# Altium PCB current sink.PcbDoc (part 1 of 2)
Units mm, origin at the board's own origin, x right, y up, seen from the top; angles counter-clockwise.
Board outline 128.91 x 103.89 mm, 2 copper layers (Top Layer, Bottom Layer); 147 components, 85 nets, 489 pads, 208 vias.
Unrouted connection lines stored in the file: 1.
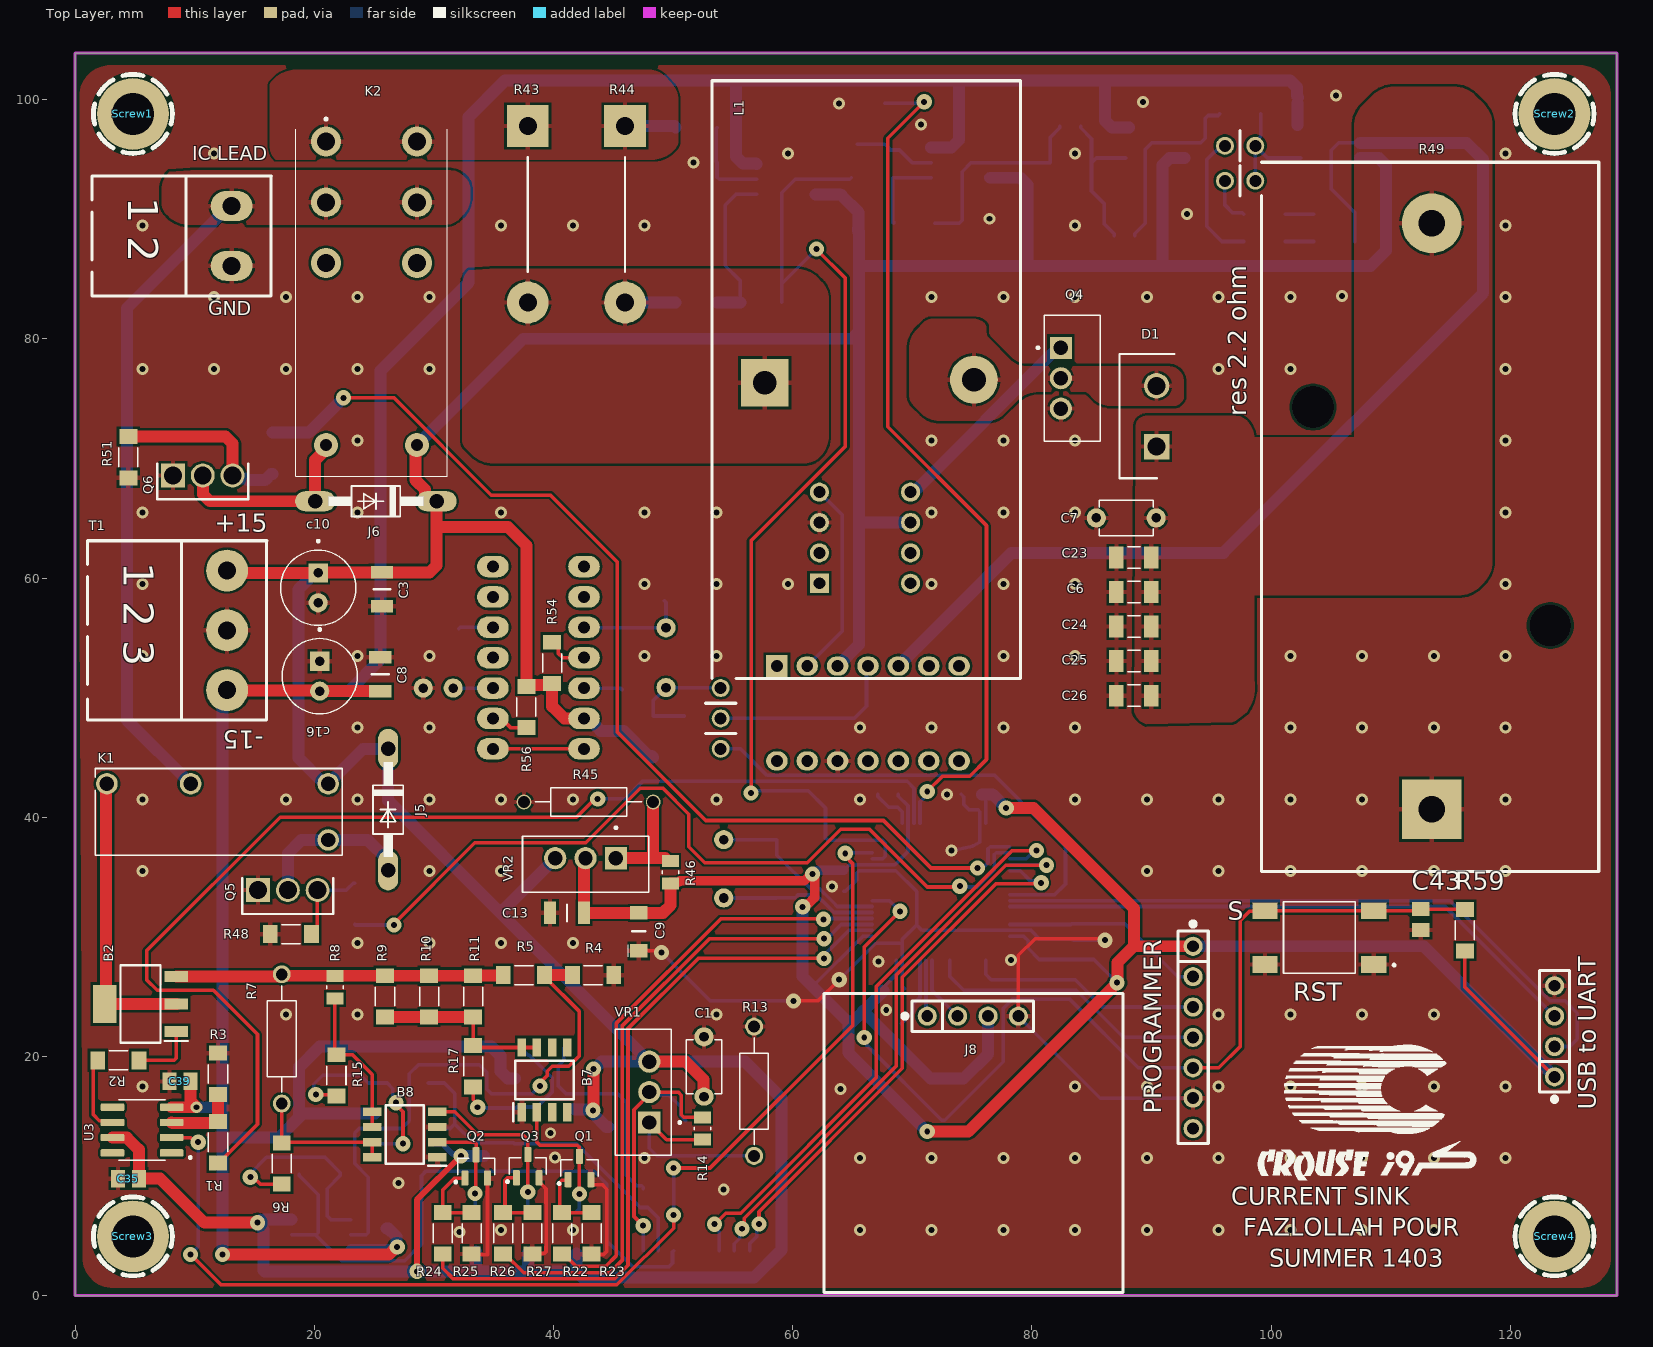
[diagram p0: Top Layer view]
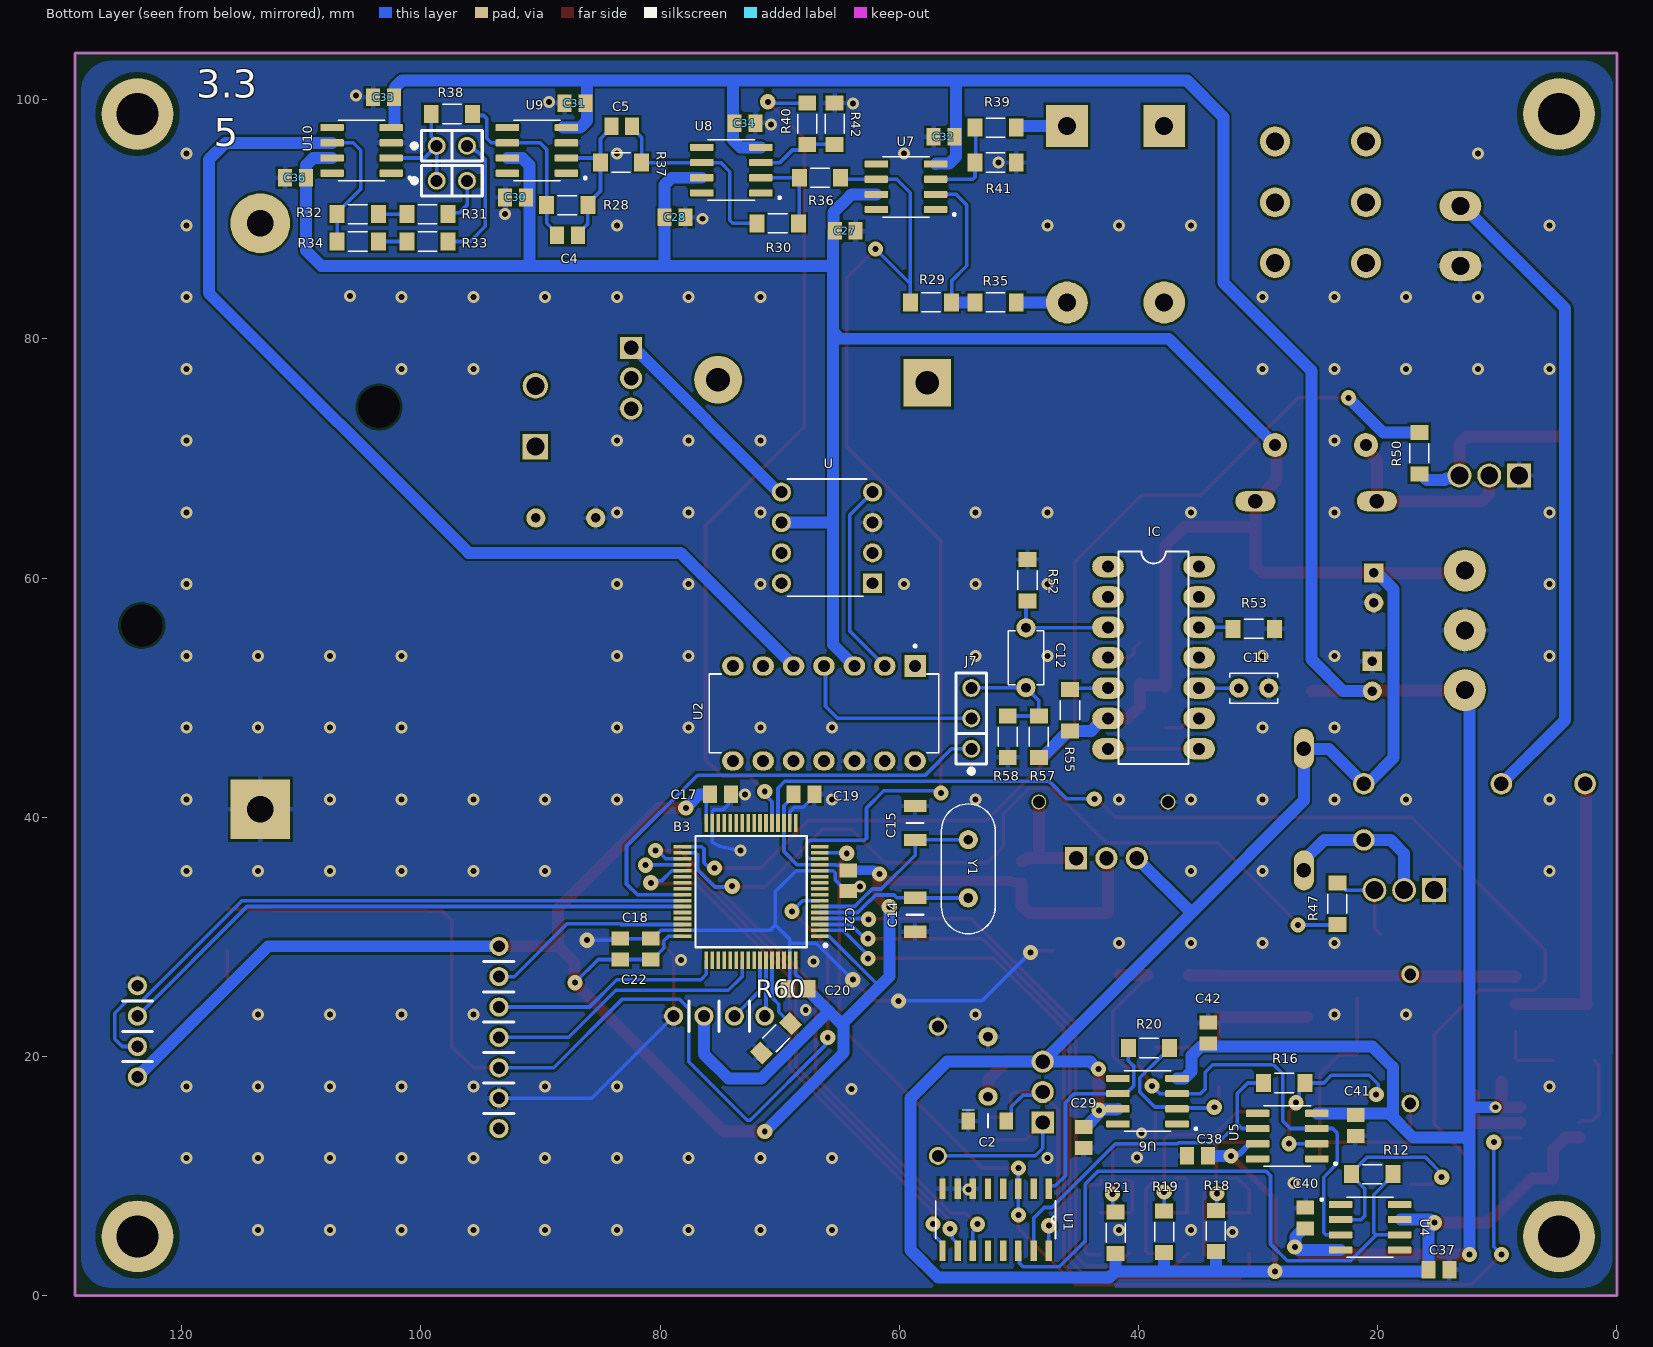
[diagram p1: Bottom Layer view, seen from below]
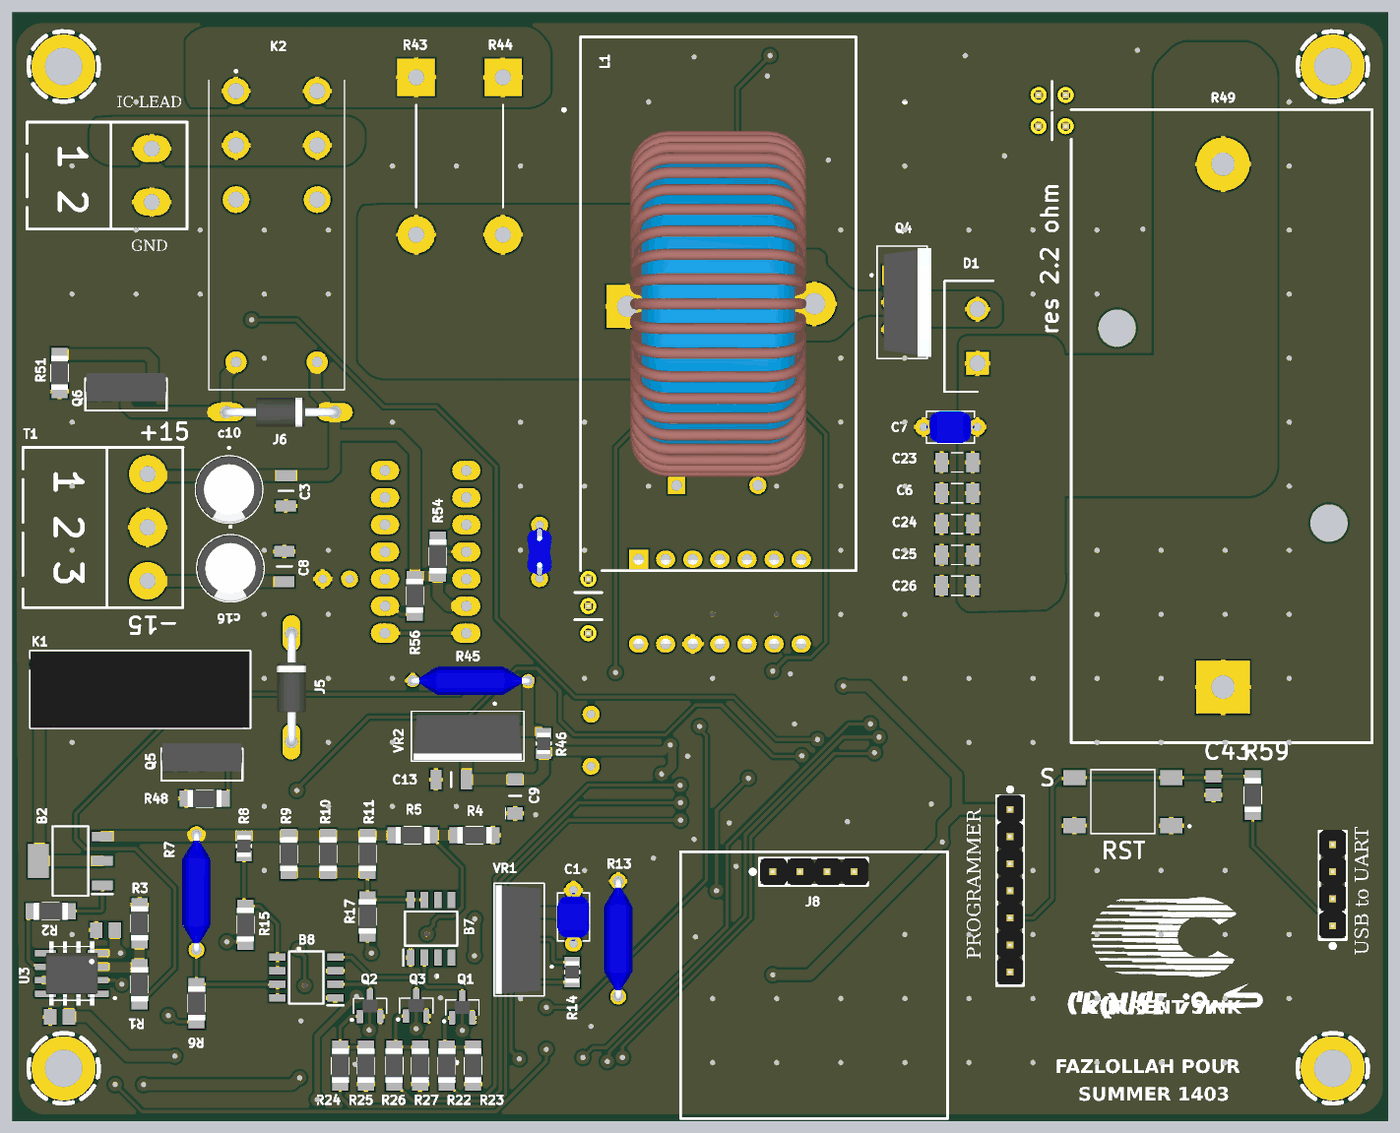
[diagram p3: 3D render of the assembled board from above, using the file's embedded part models]
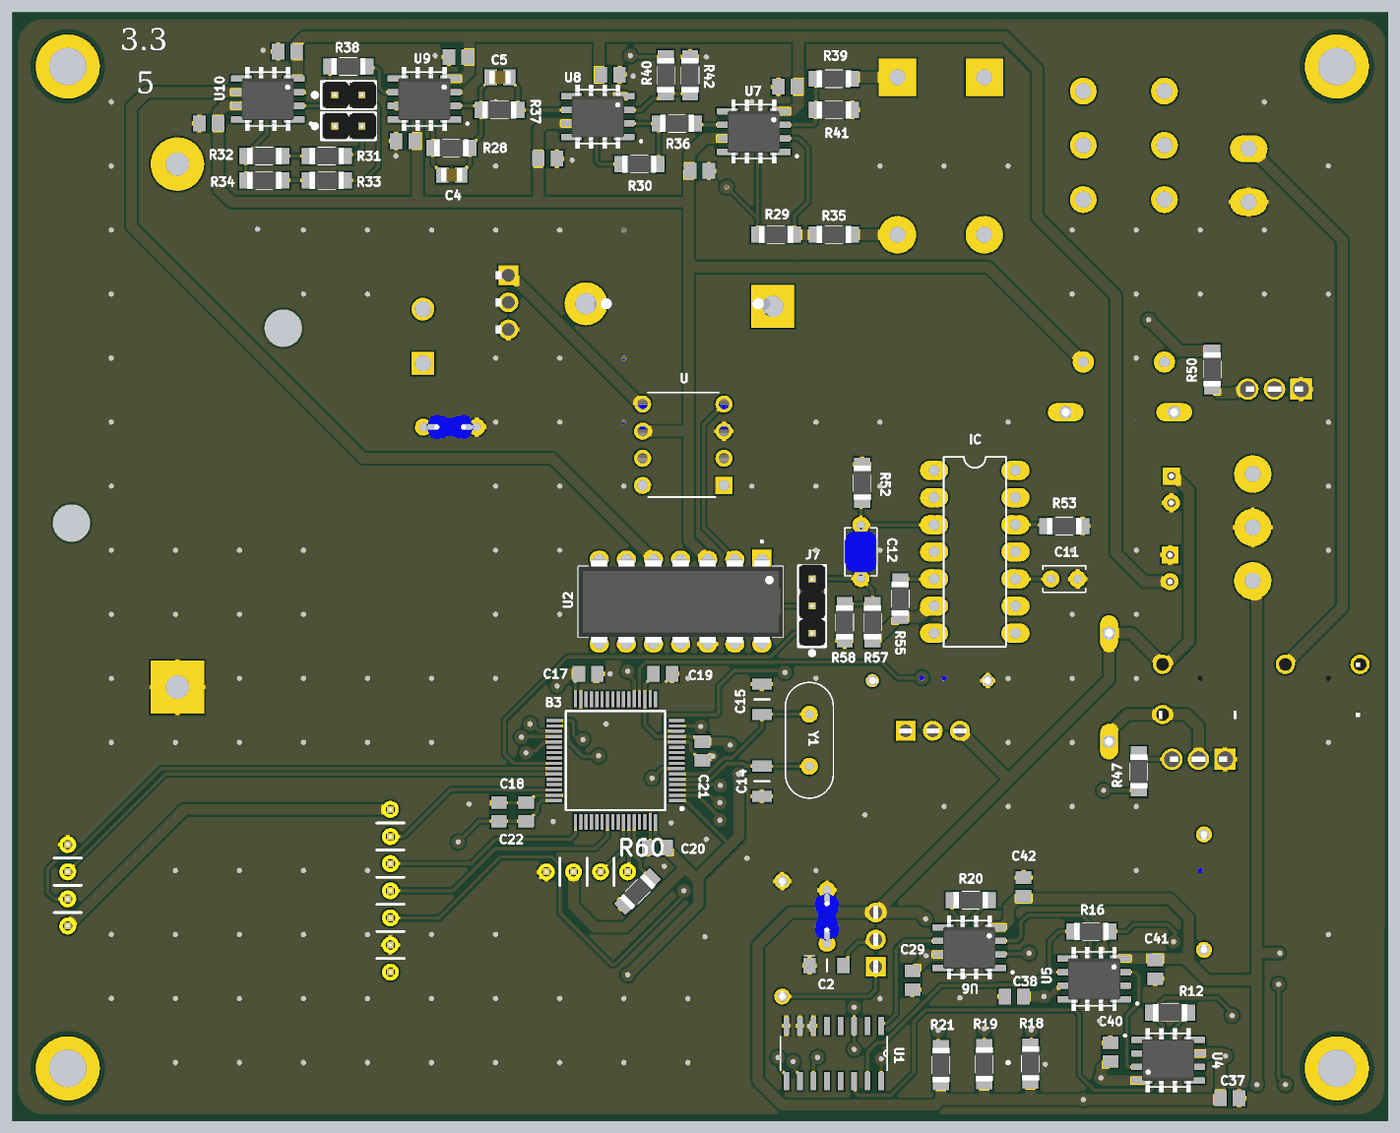
[diagram p4: 3D render of the assembled board from below, using the file's embedded part models]

## Layer stack, top to bottom
Top Solder: solder mask 0.0102, Solder Resist, Dk 3.5
Top Layer: signal copper 0.0356
Dielectric 1: dielectric 0.32, FR-4, Dk 4.8
Bottom Layer: signal copper 0.0356
Bottom Solder: solder mask 0.0102, Solder Resist, Dk 3.5

## Board outline
0,0 0,103.886 128.905,103.886 128.905,0

## Design rules (kind name [scope] priority, off if disabled: settings)
Clearance [All] p1: gap=0.2 ignorepadtopadclearanceinfootprint=TRUE
Height [All] p1: minheight=0 maxheight=50 prefheight=12.7
HoleSize [All] p1: absolutevalues=TRUE maxlimit=5 minlimit=0.025 maxpercent=80.000 minpercent=20.000
PolygonConnect PolygonConnect_1 [All vs (InNet('NetC6_1') AND InNet('NetD1_2') AND InNet('fb+') AND InNet('fb-') AND InNet('IC pin'))] p1: thpad.connectstyle=Relief thpad.reliefconductorwidth=0.7 thpad.reliefentries=4 thpad.polygonreliefangle="90 Angle" thpad.airgapwidth=0.2 smdpad.connectstyle=Relief smdpad.reliefconductorwidth=0.7 smdpad.reliefentries=4 smdpad.polygonreliefangle="90 Angle" smdpad.airgapwidth=0.2 via.connectstyle=Direct via.reliefconductorwidth=0.254 via.reliefentries=4 via.polygonreliefangle="90 Angle" via.airgapwidth=0.254
PolygonConnect [All] p2: thpad.connectstyle=Relief thpad.reliefconductorwidth=0.4 thpad.reliefentries=4 thpad.polygonreliefangle="90 Angle" thpad.airgapwidth=0.2 smdpad.connectstyle=Relief smdpad.reliefconductorwidth=0.4 smdpad.reliefentries=4 smdpad.polygonreliefangle="90 Angle" smdpad.airgapwidth=0.2 via.connectstyle=Direct via.reliefconductorwidth=0.254 via.reliefentries=4 via.polygonreliefangle="90 Angle" via.airgapwidth=0.254
RoutingVias [All] p1: holewidth=0.711 width=1.27 viastyle="Through Hole" minholewidth=0.5 minwidth=1 maxholewidth=5 maxwidth=5
SolderMaskExpansion [All] p1: expansion=0.102 istentingtop=FALSE
SupplyNets "Schematic Supply Nets_3" [InNet('+15')] p1: voltage=0.000
SupplyNets "Schematic Supply Nets_2" [InNet('GND')] p2: voltage=0.000
SupplyNets "Schematic Supply Nets_1" [InNet('-15')] p3: voltage=0.000
SupplyNets "Schematic Supply Nets" [InNet('+3.3')] p4: voltage=0.000
Width [All] p1: maxlimit=20 minlimit=0.3 preferedwidth=0.3 minimp=50.000000 maximp=50.000000 favimp=50.000000
28 further rules are at their usual default settings.

## Components (designator, comment, footprint, x,y, rotation, side; value= is the part's Value field where it differs from the comment)
3.3 "if tri 5" Header-1X2 97.409,96.139 r180 bottom (schematic designator J3)
5 "if tri 3.3" Header-1X2 97.409,93.218 r180 bottom (schematic designator J2)
B2 "BSP100" SOT230P700X180-4N 5.461,24.384 r180 top
B3 "STM32F103RCT6" QFP50P1200X1200X160-64N 72.39,33.782 r0 bottom
B7 "IRF7303PBF" SOIC127P600X175-8N 39.243,18.034 r90 top
B8 "IRF7303PBF" SOIC127P600X175-8N 27.559,13.462 r180 top
C1 "100nf ceramic" CAPRB500W50L450T300H550#1 52.578,19.137 r270 top
C2 "tantalum 1uf" CAPC2012X140N 52.578,14.605 r180 bottom
C3 "cap 100nf" CAPC3216X170N 25.654,59.055 r90 top
C4 "180nF 0805" CAPC2012X145N 87.739,88.646 r0 bottom
C5 "390nF 0805" CAPC2012X145N 83.203,97.79 r0 bottom
C6 "47uf 1206" CAPC3216X180N 88.519,58.833 r0 top
C7 "100nf ceramic" CAPRB500W50L450T300H550#2 87.884,65.024 r0 top
C8 "cap 100nf" CAPC3216X170N 25.504,51.966 r90 top
C9 "tantalum 1uf" CAPC2012X140N 47.117,30.48 r90 top
c10 "Cap 100uF" "Cap 100uF" 20.32,59.182 r270 top
C11 "1nF cermicd102" CAPRB250W50L400T250H550 30.353,50.8 r0 bottom
C12 "100nf ceramic" CAPRB500W50L450T300H550#2 49.403,53.34 r270 bottom
C13 "cap 100nf 1206" CAPC3216X170N 41.125,32.004 r0 top
C14 "cap 20pf 1206" CAPC3216X170N 58.674,31.854 r270 bottom
C15 "cap 20pf 1206" CAPC3216X170N 58.674,39.52 r90 bottom
c16 "Cap 100uF" "Cap 100uF" 20.447,51.796 r270 top
C17 "100nf 0805" CAPC2012X145N 74.948,41.91 r180 bottom
C18 "100nf 0805" CAPC2012X145N 80.772,28.974 r90 bottom
C19 "100nf 0805" CAPC2012X145N 67.963,41.91 r180 bottom
C20 "100nf 0805" CAPC2012X145N 68.471,25.654 r0 bottom
C21 "100nf 0805" CAPC2012X145N 64.262,34.689 r270 bottom
C22 "4.7uf 0805" CAPC2012X145N 83.312,28.974 r90 bottom
C23 "47uf 1206" CAPC3216X180N 88.519,61.722 r0 top
C24 "47uf 1206" CAPC3216X180N 88.519,55.944 r0 top
C25 "47uf 1206" CAPC3216X180N 88.519,53.054 r0 top
C26 "47uf 1206" CAPC3216X180N 88.519,50.165 r0 top
C27 "100nf 0805" CAPC2012X145N 64.516,89.027 r180 bottom
C28 "100nf 0805" CAPC2012X145N 78.74,90.17 r180 bottom
C29 "100nf 0805" CAPC2012X145N 44.577,13.208 r270 bottom
C30 "100nf 0805" CAPC2012X145N 92.075,91.821 r0 bottom
C31 "100nf 0805" CAPC2012X145N 87.122,99.695 r0 bottom
C32 "100nf 0805" CAPC2012X145N 56.261,96.901 r0 bottom
C33 "100nf 0805" CAPC2012X145N 103.124,100.203 r0 bottom
C34 "100nf 0805" CAPC2012X145N 72.898,98.044 r180 bottom
C35 "100nf 0805" CAPC2012X145N 4.445,9.779 r180 top
C36 "100nf 0805" CAPC2012X145N 110.49,93.472 r0 bottom
C37 "100nf 0805" CAPC2012X145N 14.859,2.159 r180 bottom
C38 "100nf 0805" CAPC2012X145N 35.052,11.684 r0 bottom
C39 "100nf 0805" CAPC2012X145N 8.763,17.907 r180 top
C40 "100nf 0805" CAPC2012X145N 26.035,6.477 r90 bottom
C41 "100nf 0805" CAPC2012X145N 21.844,14.224 r270 bottom
C42 "100nf 0805" CAPC2012X145N 34.163,21.953 r90 bottom
C43 "100nf 0805" CAPC2012X145N 112.522,31.442 r270 top
D1 "STPS1545FP" TO508P460X1020X2030-2P 90.424,70.998 r90 top
IC "ICL8038" ICL8038 38.735,53.34 r270 bottom
"IC LEAD" "Phoenix terminal" "phoenix terminal 2" 1.397,93.599 r270 top (schematic designator T2)
J5 "1N5817" DO41-10 26.162,40.64 r270 top
J6 "1N5817" DO41-10 25.146,66.421 r180 top
J7 "Header-1X3" Header-1X3 53.975,48.26 r90 bottom
J8 "oled" Header-1X4 75.057,23.368 r0 top
K1 "G5NB-1A-E_DC12" RELAY_G5NB-1A_DC5_OMR 2.852,38.099 r270 top
K2 "TRA2_D-24VDC-S-Z" TRA2D24VDCSZ 20.975,96.5 r270 top
L1 "inductor 100u" inductor 57.15,76.581 r0 top
PROGRAMMER "programmer" Header-1X7 93.472,21.59 r270 top (schematic designator J1)
Q1 "BC817" SOT95P230X110-3N 42.164,10.668 r90 top
Q2 "BC817" SOT95P230X110-3N 33.528,10.795 r90 top
Q3 "BC817" SOT95P230X110-3N 37.846,10.831 r90 top
Q4 "IRLZ44N" TO254P1054X469X1930-3 83.363,76.708 r270 top
Q5 "BD137" TO229P300X760X1237-3P 17.78,33.909 r90 top
Q6 "BD137" TO229P300X760X1237-3P 10.668,68.58 r90 top
R1 "18k 1206" RES_ERJU08J274V 11.938,12.827 r90 top
R2 "10 ohm 1206" RES_ERJU08J274V 3.609,19.672 r0 top
R3 "2k 1206" RES_ERJU08J274V 11.938,18.542 r270 top
R4 "100k 1206" RES_ERJU08J274V 43.307,26.797 r0 top
R5 "100k 1206" RES_ERJU08J274V 37.518,26.797 r0 top
R6 "100k 1206" RES_ERJU08J274V 17.272,11.049 r270 top
R7 "33ohm axial" RESAD1081W64L635D269#1 17.272,21.463 r90 top
R8 "1.2 ohm 0805" RESC2012X60N 21.717,25.781 r90 top
R9 "1ohm 1206" RES_ERJU08J274V 25.908,25.019 r90 top
R10 "1ohm 1206" RES_ERJU08J274V 29.591,25.019 r90 top
R11 "1ohm 1206" RES_ERJU08J274V 33.274,25.019 r90 top
R12 "100k 1206" RES_ERJU08J274V 20.447,10.16 r180 bottom
R13 "604ohm axial" RESAD1081W64L635D269#1 56.769,17.089 r90 top
R14 "240ohm 0805" RESC2012X60N 52.451,13.97 r90 top
R15 "100k 1206" RES_ERJU08J274V 21.844,18.415 r270 top
R16 "100k 1206" RES_ERJU08J274V 27.813,17.78 r0 bottom
R17 "100k 1206" RES_ERJU08J274V 33.274,19.177 r270 top
R18 "10k 1206" RES_ERJU08J274V 33.528,5.408 r270 bottom
R19 "10k 1206" RES_ERJU08J274V 37.846,5.334 r270 bottom
R20 "100k 1206" RES_ERJU08J274V 39.116,20.701 r0 bottom
R21 "10k 1206" RES_ERJU08J274V 41.91,5.26 r270 bottom
R22 "10k 1206" RES_ERJU08J274V 40.716,5.207 r270 top
R23 "10k 1206" RES_ERJU08J274V 43.18,5.207 r90 top
R24 "10k 1206" RES_ERJU08J274V 30.734,5.207 r90 top
R25 "10k 1206" RES_ERJU08J274V 33.147,5.207 r90 top
R26 "10k 1206" RES_ERJU08J274V 35.789,5.207 r270 top
R27 "10k 1206" RES_ERJU08J274V 38.227,5.207 r90 top
R28 "1.21M 1206" RES_ERJU08J274V 87.757,91.186 r180 bottom
R29 "10k 1206" RES_ERJU08J274V 57.351,83.058 r0 bottom
R30 "1k 1206" RES_ERJU08J274V 70.157,89.662 r180 bottom
R31 "2k 1206" RES_ERJU08J274V 99.441,90.424 r180 bottom
R32 "3k 1206" RES_ERJU08J274V 105.283,90.424 r180 bottom
R33 "100ohm 1206" RES_ERJU08J274V 99.441,88.138 r180 bottom
R34 "7.5k 1206" RES_ERJU08J274V 105.283,88.138 r180 bottom
R35 "1k 1206" RES_ERJU08J274V 51.943,83.058 r180 bottom
R36 "1k 1206" RES_ERJU08J274V 66.622,93.472 r180 bottom
R37 "9.09k 1206" RES_ERJU08J274V 83.259,94.742 r180 bottom
R38 "2k 1206" RES_ERJU08J274V 97.409,98.806 r180 bottom
R39 "1k 1206" RES_ERJU08J274V 51.943,97.663 r180 bottom
R40 "1k 1206" RES_ERJU08J274V 67.691,97.991 r90 bottom
R41 "10k 1206" RES_ERJU08J274V 51.943,94.742 r0 bottom
R42 "1k 1206" RES_ERJU08J274V 65.405,97.991 r90 bottom
R43 "shunt res" shunt 37.846,97.79 r270 top
R44 "shunt res" shunt 45.974,97.79 r270 top
R45 "400ohm axial" RESAD1081W64L635D269#2 42.926,41.275 r180 top
R46 "240ohm 0805" RESC2012X60N 49.784,35.387 r270 top
R47 "12.7k 1206" RES_ERJU08J274V 23.368,32.766 r270 bottom
R48 "100k 1206" RES_ERJU08J274V 18.034,30.226 r180 top
R49 "resistor 2.2" resssss 113.425,40.665 r90 top
R50 "5k 1206" RES_ERJU08J274V 16.51,70.432 r90 bottom
R51 "100k 1206" RES_ERJU08J274V 4.445,70.104 r270 top
R52 "100k 1206" RES_ERJU08J274V 49.276,59.817 r270 bottom
R53 "82k 1206" RES_ERJU08J274V 30.353,55.753 r180 bottom
R54 "3k 1206" RES_ERJU08J274V 39.878,52.906 r90 top
R55 "3k 1206" RES_ERJU08J274V 45.72,48.948 r90 bottom
R56 "10k 1206" RES_ERJU08J274V 37.719,49.223 r270 top
R57 "20k 1206" RES_ERJU08J274V 48.323,46.736 r270 bottom
R58 "10k 1206" RES_ERJU08J274V 50.927,46.736 r90 bottom
R59 "10k 1206" RES_ERJU08J274V 116.205,30.548 r270 top
R60 "10k 1206" RES_ERJU08J274V 70.308,21.513 r315 bottom
S "1571527-2" SW_1571527-2 104.035,29.936 r180 top
Screw1 "Screw" Screw 4.826,98.806 r0 top
Screw2 "Screw" Screw 123.698,98.806 r0 top
Screw3 "Screw" Screw 4.826,4.953 r0 top
Screw4 "Screw" Screw 123.698,4.953 r0 top
T1 "Phoenix terminal" "phoenix terminal 3" 1.016,63.119 r270 top
U "TC4428CPA" DIP254P762X432-8 69.85,67.183 r0 bottom
U1 "74HC4051D" SOIC127P600X175-16N 51.943,6.35 r270 bottom
U2 "LM339N" DIP794W45P254L1918H533Q14 66.294,48.674 r270 bottom
U3 "OP07CD" SOIC127P599X175-8N 5.588,13.843 r180 top
U4 "OP07CD" SOIC127P599X175-8N 20.631,5.715 r180 bottom
U5 "OP07CD" SOIC127P599X175-8N 27.559,13.335 r0 bottom
U6 "OP07CD" SOIC127P599X175-8N 39.243,16.256 r0 bottom
U7 "OP07CD" SOIC127P599X175-8N 59.436,92.71 r0 bottom
U8 "OP07CD" SOIC127P599X175-8N 74.041,94.107 r0 bottom
U9 "OP07CD" SOIC127P599X175-8N 90.297,95.758 r0 bottom
U10 "OP07CD" SOIC127P599X175-8N 104.959,95.758 r0 bottom
"USB to UART" "USB to UART" Header-1X4 123.698,22.098 r90 top (schematic designator J4)
VR1 "LM317T" TO254P1054X470X1955-3 48.006,17.018 r90 top
VR2 "LM317T" TO254P1054X470X1955-3 42.672,36.576 r180 top
Y1 "8MHz" XTAL_HC49P488W43L1085T450H368 54.229,35.687 r270 bottom

## Footprints (in the part's own frame and the unit in brackets; to place one, negate y for a bottom-side part, rotate by r counter-clockwise, add the part's x,y. Pads: shape width x height; smd on the part's side, far side on the other; paste and mask are expansions set on the pad)
"Cap 100uF" [mm]
  rect 1.6x1.6 hole 0.8: 1(-1.25,0)
  round 1.6 hole 0.8: 2(1.25,0)
  silkscreen extent -4,-3.15 3.15,3.15, body extent -3.15,-3.15 3.15,3.15, height 11.2
CAPC2012X140N [mm]
  rect 1.15x1.45 smd: 1(-1.651,0) 2(1.524,0)
  silkscreen extent -2.16,-0.55 0,0.89
CAPC2012X145N [mm]
  rect 1.17x1.47 smd: 1(-0.871,0) 2(0.871,0)
  body extent -1,-0.63 1,0.63, height 1.45
CAPC3216X170N [mm]
  rect 1.03x1.87 smd: 1(-1.42,0) 2(1.42,0)
  silkscreen extent 0,-0.7 0,0.7
CAPC3216X180N [mm]
  rect 1.21x1.82 smd: 1(-1.45,0) 2(1.45,0)
  silkscreen extent -0.52,-0.9 0.52,0.9
CAPRB250W50L400T250H550 [mm]
  round 1.6 hole 0.8: 1(-1.25,0) 2(1.25,0)
  silkscreen extent -2,-1.25 2,1.25
CAPRB500W50L450T300H550#1 [mm]
  round 1.6 hole 0.8: 1(-2.5,0)
  oval 1.5x1.6 hole 0.8: 2(2.5,0)
  silkscreen extent -2.25,-1.5 2.25,1.5, body extent -2.24,-1.5 2.24,1.5, height 2.75
CAPRB500W50L450T300H550#2 [mm]
  round 1.6 hole 0.8: 1(-2.5,0) 2(2.5,0)
  silkscreen extent -2.25,-1.5 2.25,1.5, body extent -2.24,-1.5 2.24,1.5, height 2.75
DIP254P762X432-8 [mm]
  rect 1.6x1.6 hole 1: 1(-7.62,7.62)
  round 1.6 hole 1: 2(-7.62,5.08) 3(-7.62,2.54) 4(-7.62,0) 5(0,0) 6(0,2.54) 7(0,5.08) 8(0,7.62)
  silkscreen extent -7.11,-1.09 -0.51,8.71
DIP794W45P254L1918H533Q14 [mm]
  rect 1.8x1.8 / inner round 1.8 / far side rect 1.8x1.8 hole 1: 1(-3.97,7.62)
  oval 1.6x1.8 hole 1: 2(-3.97,5.08) 3(-3.97,2.54) 4(-3.97,0) 5(-3.97,-2.54) 6(-3.97,-5.08) 7(-3.97,-7.62) 8(3.97,-7.62) 9(3.97,-5.08) 10(3.97,-2.54) 11(3.97,0) 12(3.97,2.54) 13(3.97,5.08) 14(3.97,7.62)
  silkscreen extent -5.73,-9.59 3.3,9.59, body extent -3.95,-9.59 3.95,9.59, height 5.33
DO41-10 [mil]
  oval 132x66 hole 47.24: A(200,0) C(-200,0)
  silkscreen extent -155,-50 155,50, body extent -216,-53 216,53, height 106
Header-1X2 [mm] "Pin Header 1X2, Pitch=2.54mm"
  round 1.5 hole 1: 1(-1.27,0) 2(1.27,0)
  silkscreen extent -3.33,-1.27 2.54,1.27, body extent -2.44,-1.25 2.64,1.25, height 8.24
Header-1X3 [mm] "Pin Header 1X3, Pitch=2.54mm"
  round 1.5 hole 1: 1(-2.54,0) 2(0,0) 3(2.54,0)
  silkscreen extent -4.6,-1.27 3.81,1.27, body extent -3.71,-1.25 3.91,1.25, height 8.24
Header-1X4 [mm] "Pin Header 1X4, Pitch=2.54mm"
  round 1.6 hole 1: 1(-3.81,0) 2(-1.27,0) 3(1.27,0) 4(3.81,0)
  silkscreen extent -5.87,-1.27 5.08,1.27, body extent -4.98,-1.25 5.18,1.25, height 8.24
Header-1X7 [mm] "Pin Header 1X7, Pitch=2.54mm"
  round 1.6 hole 1: 1(-7.62,0) 2(-5.08,0) 3(-2.54,0) 4(0,0) 5(2.54,0) 6(5.08,0) 7(7.62,0)
  silkscreen extent -9.68,-1.27 8.89,1.27, body extent -8.99,-1.25 8.79,1.25, height 8.2
ICL8038 [mm]
  oval 1.8x2.642 hole 1: 1(-7.62,-3.81) 2(-5.08,-3.81) 3(-2.54,-3.81) 4(0,-3.81) 5(2.54,-3.81) 6(5.08,-3.81) 7(7.62,-3.81) 8(7.62,3.81) 9(5.08,3.81) 10(2.54,3.81) 11(0,3.81) 12(-2.54,3.81) 13(-5.08,3.81) 14(-7.62,3.81)
  silkscreen extent -8.89,-2.92 8.89,2.92
inductor [mm]
  rect 4x4 hole 2: 1(0.508,-0.254)
  round 4 hole 2: 2(18,0)
  silkscreen extent -3.89,-25 21.89,25, body extent 0.74,-16.21 17.25,16.21, height 34.1
"phoenix terminal 2" [mm] "2 terminals"
  oval 2.5x3.5 hole 1.5: 1(2.493,11.684) 2(7.493,11.684)
  silkscreen extent 0,0 10.03,15
"phoenix terminal 3" [mm] "3 terminals"
  round 3.5 hole 1.5: 1(2.493,11.684) 2(7.493,11.684) 3(12.493,11.684)
  silkscreen extent 0,0 15,15
QFP50P1200X1200X160-64N [mm]
  rect 1.475x0.3 smd: 1(-5.738,3.75) 2(-5.738,3.25) 3(-5.738,2.75) 4(-5.738,2.25) 5(-5.738,1.75) 6(-5.738,1.25) 7(-5.738,0.75) 8(-5.738,0.25) 9(-5.738,-0.25) 10(-5.738,-0.75) 11(-5.738,-1.25) 12(-5.738,-1.75) 13(-5.738,-2.25) 14(-5.738,-2.75) 15(-5.738,-3.25) 16(-5.738,-3.75) 33(5.738,-3.75) 34(5.738,-3.25) 35(5.738,-2.75) 36(5.738,-2.25) 37(5.738,-1.75) 38(5.738,-1.25) 39(5.738,-0.75) 40(5.738,-0.25) 41(5.738,0.25) 42(5.738,0.75) 43(5.738,1.25) 44(5.738,1.75) 45(5.738,2.25) 46(5.738,2.75) 47(5.738,3.25) 48(5.738,3.75)
  rect 0.3x1.475 smd: 17(-3.75,-5.738) 18(-3.25,-5.738) 19(-2.75,-5.738) 20(-2.25,-5.738) 21(-1.75,-5.738) 22(-1.25,-5.738) 23(-0.75,-5.738) 24(-0.25,-5.738) 25(0.25,-5.738) 26(0.75,-5.738) 27(1.25,-5.738) 28(1.75,-5.738) 29(2.25,-5.738) 30(2.75,-5.738) 31(3.25,-5.738) 32(3.75,-5.738) 49(3.75,5.738) 50(3.25,5.738) 51(2.75,5.738) 52(2.25,5.738) 53(1.75,5.738) 54(1.25,5.738) 55(0.75,5.738) 56(0.25,5.738) 57(-0.25,5.738) 58(-0.75,5.738) 59(-1.25,5.738) 60(-1.75,5.738) 61(-2.25,5.738) 62(-2.75,5.738) 63(-3.25,5.738) 64(-3.75,5.738)
  silkscreen extent -6.35,-4.65 4.65,4.65
RELAY_G5NB-1A_DC5_OMR [mm]
  round 1.8 hole 1.2: 1(-4.7,18.3) 2(-4.7,6.8) 3(-4.7,-0.2) 4(0,18.3)
  silkscreen extent -5.98,-1.18 1.28,19.48, body extent -5.93,-1.11 1.27,19.39, height 15.3
RES_ERJU08J274V [mm]
  rect 1.25x1.5 smd: 1(-1.725,0) 2(1.725,0)
  silkscreen extent -0.78,-0.8 0.78,0.8, body extent -1.6,-0.8 1.6,0.8, height 0.6
RESAD1081W64L635D269#1 [mm]
  round 1.5 hole 1: 1(-5.405,0) 2(5.405,0)
  silkscreen extent -4.46,-1.19 4.46,1.19, body extent -5.72,-1.35 5.72,1.35, height 2.69
RESAD1081W64L635D269#2 [mm]
  round 1.24 hole 1: 1(-5.405,0) 2(5.405,0)
  silkscreen extent -4.46,-1.19 4.46,1.19, body extent -5.72,-1.35 5.72,1.35, height 2.69
RESC2012X60N [mm]
  rect 1x1.42 smd: 1(-0.935,0) 2(0.935,0)
  silkscreen extent -0.12,-0.7 0.12,0.7, body extent -1,-0.63 1,0.63, height 0.6
resssss [mm]
  round 5 hole 2.2: 0(49,0)
  rect 5x5 hole 2.2: 1(0,0)
  round 1.524 hole 3.5: 3(15.37,-9.92) 3(33.63,9.92)
  silkscreen extent -5.21,-13.97 54.1,14.22
Screw [mm]
  round 6 / inner round 3.5 / far side round 6 hole 3.5 mask+0.1: 1(0,0)
  Top Layer pour cut-out: 0,3.5 -0.229,3.5 -0.684,3.44 -1.127,3.321 -1.551,3.146 -1.949,2.916 -2.313,2.637 -2.637,2.313 -2.916,1.949 -3.146,1.551 -3.321,1.127 -3.44,0.684 -3.5,0.229 -3.5,0 -3.5,0 -3.5,-0.229 -3.44,-0.684 -3.321,-1.127 -3.146,-1.551 -2.916,-1.949 -2.637,-2.313 -2.313,-2.637 -1.949,-2.916 -1.551,-3.146 -1.127,-3.321 -0.684,-3.44 -0.229,-3.5 0,-3.5 0.229,-3.5 0.684,-3.44 1.127,-3.321 1.551,-3.146 1.949,-2.916 2.313,-2.637 2.637,-2.313 2.916,-1.949 3.146,-1.551 3.321,-1.127 3.44,-0.684 3.5,-0.229 3.5,0 3.5,0.229 3.44,0.684 3.321,1.127 3.146,1.551 2.916,1.949 2.637,2.313 2.313,2.637 1.949,2.916 1.551,3.146 1.127,3.321 0.684,3.44 0.229,3.5 0,3.5
  Bottom Layer pour cut-out: 0,3.5 -0.229,3.5 -0.684,3.44 -1.127,3.321 -1.551,3.146 -1.949,2.916 -2.313,2.637 -2.637,2.313 -2.916,1.949 -3.146,1.551 -3.321,1.127 -3.44,0.684 -3.5,0.229 -3.5,0 -3.5,0 -3.5,-0.229 -3.44,-0.684 -3.321,-1.127 -3.146,-1.551 -2.916,-1.949 -2.637,-2.313 -2.313,-2.637 -1.949,-2.916 -1.551,-3.146 -1.127,-3.321 -0.684,-3.44 -0.229,-3.5 0,-3.5 0.229,-3.5 0.684,-3.44 1.127,-3.321 1.551,-3.146 1.949,-2.916 2.313,-2.637 2.637,-2.313 2.916,-1.949 3.146,-1.551 3.321,-1.127 3.44,-0.684 3.5,-0.229 3.5,0 3.5,0.229 3.44,0.684 3.321,1.127 3.146,1.551 2.916,1.949 2.637,2.313 2.313,2.637 1.949,2.916 1.551,3.146 1.127,3.321 0.684,3.44 0.229,3.5 0,3.5
  silkscreen extent -3.3,-3.3 3.3,3.3
shunt [mm]
  rect 3.5x3.5 hole 1.5: 0(0,0)
  round 3.5 hole 1.5: 1(14.75,0)
  silkscreen extent 2.58,0 12.17,0
SOIC127P599X175-8N [mm]
  rrect25% 1.97x0.6 smd: 1(-2.47,1.905) 2(-2.47,0.635) 3(-2.47,-0.635) 4(-2.47,-1.905) 5(2.47,-1.905) 6(2.47,-0.635) 7(2.47,0.635) 8(2.47,1.905)
  silkscreen extent -4.14,-2.52 1.95,2.52, body extent -2.45,-3 2.45,3, height 1.75
SOIC127P600X175-8N [mm]
  rect 1.525x0.7 smd: 1(-2.712,1.905) 2(-2.712,0.635) 3(-2.712,-0.635) 4(-2.712,-1.905) 5(2.712,-1.905) 6(2.712,-0.635) 7(2.712,0.635) 8(2.712,1.905)
  silkscreen extent -3.47,-2.45 1.6,2.61
SOIC127P600X175-16N [mil]
  rect 67x21 smd: 1(-102,175) 2(-102,125) 3(-102,75) 4(-102,25) 5(-102,-25) 6(-102,-75) 7(-102,-125) 8(-102,-175) 9(102,-175) 10(102,-125) 11(102,-75) 12(102,-25) 13(102,25) 14(102,75) 15(102,125) 16(102,175)
  silkscreen extent -62,-197 62,197
SOT95P230X110-3N [mm]
  rrect25% 1.26x0.59 smd: 1(-0.98,0.95) 2(-0.98,-0.95) 3(0.98,0)
  silkscreen extent -1.4,-1.56 0.7,1.8, body extent -0.6,-0.7 0.6,0.7, height 0.5
SOT230P700X180-4N [mm]
  rect 1.95x0.9 smd: 1(-3,2.3) 2(-3,0) 3(-3,-2.3)
  rect 1.95x3.2 smd: 4(3,0)
  silkscreen extent -3.98,-3.25 1.68,3.25
SW_1571527-2 [mm]
  rect 2.1x1.4 smd: 1(-4.55,2.25) 2(4.55,2.25) 3(-4.55,-2.25) 4(4.55,-2.25)
  silkscreen extent -6.35,-3 3,3
TO229P300X760X1237-3P [mm]
  rect 2x2 hole 1.5: 1(0,2.49)
  round 2 hole 1.5: 2(0,0) 3(0,-2.49)
  silkscreen extent -2,-3.8 1,3.8, body extent -1.14,-3.8 1.52,3.8, height 13.2
TO254P1054X469X1930-3 [mm]
  rect 1.85x1.85 / inner round 1.85 / far side rect 1.85x1.85 hole 1.2: 1(-2.54,-0.94)
  round 1.85 hole 1.2: 2(0,-0.94) 3(2.54,-0.94)
  silkscreen extent -5.27,-2.96 5.27,2.35, body extent -5.08,-1.71 5.08,2.73, height 15.01
TO254P1054X470X1955-3 [mm]
  rect 1.86x1.86 / inner round 1.86 / far side rect 1.86x1.86 hole 1.2: 1(-2.54,0)
  round 1.86 hole 1.2: 2(0,0) 3(2.54,0)
  silkscreen extent -5.27,-2.64 5.27,2.86, body extent -5.08,-1.49 5.08,2.71, height 22.86
TO508P460X1020X2030-2P [mm]
  rect 2.13x2.13 / inner round 2.13 / far side rect 2.13x2.13 hole 1.5: 1(0,0)
  round 2.13 hole 1.5: 2(5.075,0)
  silkscreen extent -2.66,-1.5 7.74,3.1
TRA2D24VDCSZ [mm]
  round 2.5 hole 1.5: 1(0,0) 2(5.08,0) 3(10.16,0) 6(10.16,7.6) 7(5.08,7.6) 8(0,7.6)
  round 2 hole 1: 4(25.38,0) 5(25.38,7.6)
  silkscreen extent -1.98,-2.55 27.98,10.15
XTAL_HC49P488W43L1085T450H368 [mm]
  round 1.6 hole 0.8: 1(-2.44,0) 2(2.44,0)
  silkscreen extent -5.43,-2.25 5.43,2.25

## Part data
3.3 5: library part Header-1X2, "Pin Header 1X2, Pitch=2.54mm"
B2: "BSP100, N-channel MOSFET Transistor 3.2 A 30 V, 4-Pin SC-73", Manufacturer_Name=Nexperia, Mouser Part Number=N/A, Datasheet Link=https://datasheet.datasheetarchive.com/originals/distributors/Datasheets-301/10655.pdf, Geometry.Height=1.8mm, Manufacturer_Part_Number=BSP100, Mouser Price/Stock=https://www.mouser.com/Search/Refine.aspx?Keyword=N%2FA
B3: "STM32F103RCT6, 32 bit ARM Cortex M3 Microcontroller 72MHz 256 kB Flash, 48 kB RAM, USB CAN I2C 64-Pin LQFP", Manufacturer_Name=STMicroelectronics, Mouser Part Number=511-STM32F103RCT6, Arrow Part Number=STM32F103RCT6, Arrow Price/Stock=https://www.arrow.com/en/products/stm32f103rct6/stmicroelectronics?region=nac, Datasheet Link=http://www.st.com/st-web-ui/static/active/en/resource/technical/document/datasheet/CD00191185.pdf, Geometry.Height=1.6mm, Manufacturer_Part_Number=STM32F103RCT6, Mouser Price/Stock=https://www.mouser.co.uk/ProductDetail/STMicroelectronics/STM32F103RCT6?qs=%252BB84zevwoRA6TYzZIgOIoA%3D%3D
B7 B8: "Infineon IRF7303PBF Dual N-channel MOSFET Transistor, 4.9 A, 30 V, 8-Pin SOIC", Manufacturer_Name=Infineon, Mouser Part Number=942-IRF7303PBF, Arrow Part Number=IRF7303PBF, Arrow Price/Stock=https://www.arrow.com/en/products/irf7303pbf/infineon-technologies-ag, Datasheet Link=https://componentsearchengine.com/Datasheets/2/IRF7303PBF.pdf, Geometry.Height=1.75mm, Manufacturer_Part_Number=IRF7303PBF, Mouser Price/Stock=https://www.mouser.co.uk/ProductDetail/Infineon-IR/IRF7303PBF?qs=NFlznGuI711wOOS8SabOfA%3D%3D
C1 C7 C12: library part FG24X7R2E222KNT00, "2200 pF Â±10% 250V Ceramic Capacitor X7R Radial", Package="Radial TDK", Availability="In Stock", Check_prices=https://www.snapeda.com/parts/FG24X7R2E222KNT00/TDK/view-part/?ref=eda, MF=TDK, MP=FG24X7R2E222KNT00, Price=None, Purchase-URL=https://pricing.snapeda.com/search/part/FG24X7R2E222KNT00/?ref=eda, SnapEDA_Link=https://www.snapeda.com/parts/FG24X7R2E222KNT00/TDK/view-part/?ref=snap
C2 C9: library part TCJP105M025R0500, "1ÂµF Molded Tantalum Polymer Capacitor 25V 0805 _2012 Metric_ 500mOhm @ 100kHz", Package="0805 AVX", Digi-Key_Part_Number=478-8995-1-ND, Digi-Key_Purchase_URL=https://www.digikey.com/product-detail/en/avx-corporation/TCJP105M025R0500/478-8995-1-ND/4561861?utm_source=snapeda&utm_medium=aggregator&utm_campaign=symbol, MF=AVX, MP=TCJP105M025R0500, SnapEDA_Link=https://www.snapeda.com/parts/TCJP105M025R0500/AVX%20/%20Kyocera/view-part/1681108/?ref=snap
C3 C8: library part VJ1206A270FXCAP, Package=None, Availability=Unavailable, MP=VJ1206A270FXCAP, Price=None
C4 C5: library part VJ0805A150KXCAP, "15 pF Â±10% 200V Ceramic Capacitor C0G, NP0 0805 (2012 Metric)", Package="2012 Vishay Vitramon", Check_prices=https://www.snapeda.com/parts/VJ0805A150KXCAP/Vishay+Vitramon/view-part/?ref=eda, MF="Vishay Vitramon", MP=VJ0805A150KXCAP, SnapEDA_Link=https://www.snapeda.com/parts/VJ0805A150KXCAP/Vishay+Vitramon/view-part/?ref=snap
C6 C23 C24 C25 C26: library part GRM31C5C2A104JA01L, "SMD Capacitor C0G(EIA) with Capacitance: 0.10uF Tol. 5%. Rated Voltage: 100Vdc", Package="3216 Murata", Arrow_Electronics-Purchase-URL=https://snapeda.com/shop?store=Arrow+Electronics&id=4379036, Availability=Unavailable, DigiKey-Purchase-URL=https://snapeda.com/shop?store=DigiKey&id=4379036, MF=Murata, Mouser-Purchase-URL=https://snapeda.com/shop?store=Mouser&id=4379036, MP=GRM31C5C2A104JA01L, Price=None, SnapEDA_Link=https://www.snapeda.com/parts/GRM31C5C2A104JA01L/Murata/view-part/4379036/?ref=snap
C11: library part FK18C0G2A102JN020, "Multilayer Ceramic Capacitors MLCC - Leaded MLCC,C0G,100V,1nF, 5%,2.5mm", Package=None, Availability="In Stock", Check_prices=https://www.snapeda.com/parts/FK18C0G2A102JN020/TDK/view-part/?ref=eda, MF=TDK, MP=FK18C0G2A102JN020, Price=None, Purchase-URL=https://pricing.snapeda.com/search/part/FK18C0G2A102JN020/?ref=eda, SnapEDA_Link=https://www.snapeda.com/parts/FK18C0G2A102JN020/TDK/view-part/?ref=snap
C13 C14 C15: library part VJ1206Y104KXQPW1BC, "Multilayer Ceramic Capacitors MLCC - SMD/SMT 1206 0.1uF 10volts X7R 10%", Manufacturer_Name=Vishay, Mouser Part Number=77-VJ1206Y104KXQPBC, Datasheet Link=http://www.vishay.com/docs/45200/vjhirelseries.pdf, Geometry.Height=1.7mm, Manufacturer_Part_Number=VJ1206Y104KXQPW1BC, Mouser Price/Stock=https://www.mouser.co.uk/ProductDetail/Vishay-Vitramon/VJ1206Y104KXQPW1BC?qs=2YUU0rNB2ureKkHl5gTRXQ%3D%3D
C17 C18 C19 C20 C21 C22 C27 C28 C29 C30 C31 C32 C33 C34 C35 C36 C37 C38 C39 C40 C41 C42 C43: library part VJ0805A560KXCAP, Package=None, Availability=Unavailable, MP=VJ0805A560KXCAP, Price=None
D1: "STMicroelectronics STPS1545FP, Schottky Diode, 45V 15A, 2-Pin TO-220FPAC", Manufacturer_Name=STMicroelectronics, Mouser Part Number=511-STPS1545FP, Arrow Part Number=STPS1545FP, Arrow Price/Stock=https://www.arrow.com/en/products/stps1545fp/stmicroelectronics?region=europe, Datasheet Link=http://uk.rs-online.com/web/p/products/8107336, Geometry.Height=4.6mm, Manufacturer_Part_Number=STPS1545FP, Mouser Price/Stock=https://www.mouser.co.uk/ProductDetail/STMicroelectronics/STPS1545FP?qs=NP3vpjCFX6hHd5n%2FoyDXRA%3D%3D
IC: "IC OSCILL GEN/VOLT CONTROL 14DIP", Package=None, Availability=Unavailable, MF="Renesas Electronics", MP=ICL8038, Price=None, SnapEDA_Link=https://www.snapeda.com/parts/ICL8038/Renesas%20Electronics%20America%20Inc./view-part/1764984/?ref=snap
"IC LEAD": library part "Phoenix terminal 2", "Terminal 2 Pin", ComponentLinkURL=www.picpars.com, Designer="Seyed Mohsen Ghasemain", E-mail=picpars@gmail.com
J5 J6: "Diode Schottky 20 V 1A Through Hole DO-41", Package="DO-41 Diodes Inc.", Availability="In Stock", Check_prices=https://www.snapeda.com/parts/1N5817-T/Diodes+Inc./view-part/?ref=eda, MF="Diodes Inc.", MP=1N5817-T, Price=None, Purchase-URL=https://pricing.snapeda.com/search/part/1N5817-T/?ref=eda, SnapEDA_Link=https://www.snapeda.com/parts/1N5817-T/Diodes+Inc./view-part/?ref=snap
J7: "Pin Header 1X3, Pitch=2.54mm"
J8 "USB to UART": library part Header-1X4, "Pin Header 1X4, Pitch=2.54mm"
K1: "Power PCB Relay, 3A/5A, SPST-NO, 12 VDC, G5NB Series", Package=None, Check_prices=https://www.snapeda.com/parts/G5NB-1A-E%20DC12/Omron+Electronics+Inc-EMC+Div/view-part/?ref=eda, MF="Omron Electronics Inc-EMC Div", MP="G5NB-1A-E DC12", SnapEDA_Link=https://www.snapeda.com/parts/G5NB-1A-E%20DC12/Omron+Electronics+Inc-EMC+Div/view-part/?ref=snap
K2: "RELAY 24V/DC 1CO TRA2L-24VDC-S-Z", Manufacturer_Name="TIANBO Electronics", Manufacturer_Part_Number="TRA2 D-24VDC-S-Z", Datasheet Link=http://www.tianbo-relay.com/upload/2019062416545013.pdf, Geometry.Height=20.8mm
L1 R43 R44: library part Component_1
PROGRAMMER: library part Header-1X6, "Pin Header 1X6, Pitch=2.54mm"
Q1 Q2 Q3: "Bipolar (BJT) Transistor NPN 45V 500mA 100MHz 250mW Surface Mount TO-236AB", Package="SOT-23-3 Rectron", Availability="In Stock", Check_prices=https://www.snapeda.com/parts/BC817/Rectron/view-part/?ref=eda, MF=Rectron, MP=BC817, Price=None, Purchase-URL=https://pricing.snapeda.com/search/part/BC817/?ref=eda, SnapEDA_Link=https://www.snapeda.com/parts/BC817/Rectron/view-part/?ref=snap
Q4: "N-Channel 55 V 47A (Tc) 3.8W (Ta), 110W (Tc) Surface Mount D2PAK", Package="TO-220-3 Infineon / IR", Availability="Not in stock", Check_prices=https://www.snapeda.com/parts/IRLZ44N/Infineon/view-part/?ref=eda, MF="Infineon / IR", MP=IRLZ44N, Price=None, SnapEDA_Link=https://www.snapeda.com/parts/IRLZ44N/Infineon/view-part/?ref=snap
Q5 Q6: "Bipolar (BJT) Transistor NPN 60 V 1.5 A - 1.25 W Through Hole TO-126", Package="TO-225-3 ON Semiconductor", Availability="In Stock", Check_prices=https://www.snapeda.com/parts/BD137/Onsemi/view-part/?ref=eda, MF="ON Semiconductor", MP=BD137, Price=None, Purchase-URL=https://pricing.snapeda.com/search/part/BD137/?ref=eda, SnapEDA_Link=https://www.snapeda.com/parts/BD137/Onsemi/view-part/?ref=snap
R1 R2 R3 R4 R5 R6 R9 R10 R11 R12 R15 R16 R17 R18 R19 R20 R21 R22 R23 R24 R25 R26 R27 R28 R29 R30 R31 R32 R33 R34 R35 R36 R37 R38 R39 R40 R41 R42 R47 R48 R50 R51 R52 R53 R54 R55 R56 R57 R58 R59 R60: library part ERJU08J274V, "1206 anti-sulfurated resistor 1206 Anti-Sulfurated", Package="3216-2 Panasonic", Check_prices=https://www.snapeda.com/parts/ERJ-U08J274V/Panasonic/view-part/?ref=eda, MF=Panasonic, MP=ERJ-U08J274V, SnapEDA_Link=https://www.snapeda.com/parts/ERJ-U08J274V/Panasonic/view-part/?ref=snap
R7 R13 R45: library part RNC55J1001DRB14, "RES 1K OHM 1/8W .5% AXIAL", Package="erc55 Vishay", Check_prices=https://www.snapeda.com/parts/RNC55J1001DRB14/Dale/view-part/?ref=eda, MF="Vishay Dale", MP=RNC55J1001DRB14, SnapEDA_Link=https://www.snapeda.com/parts/RNC55J1001DRB14/Dale/view-part/?ref=snap
R8 R14 R46: library part CR0805-JW-221ELF, "220 Ohms Â±5% 0.125W, 1/8W Chip Resistor 0805 (2012 Metric) Moisture Resistant Thick Film", Package="2012 Bourns", Availability="In Stock", Check_prices=https://www.snapeda.com/parts/CR0805-JW-221ELF/Bourns/view-part/?ref=eda, MF=Bourns, MP=CR0805-JW-221ELF, Price=None, Purchase-URL=https://pricing.snapeda.com/search/part/CR0805-JW-221ELF/?ref=eda, SnapEDA_Link=https://www.snapeda.com/parts/CR0805-JW-221ELF/Bourns/view-part/?ref=snap
S: "Switch Tactile OFF _ON_ SPST Round Button Gull Wing 0.05A 24VDC 0.98N SMD T/R", Package="SMD-6 Omron Electronics", Availability=Unavailable, EU_RoHS_Compliance=Compliant, MF="TE Connectivity / AMP", MP=1571527-2, Price=None, SnapEDA_Link=https://www.snapeda.com/parts/1571527-2/TE%20Connectivity%20/%20AMP/view-part/491702/?ref=snap
T1: library part "Phoenix terminal 3", "Terminal 3 Pin", ComponentLinkURL=www.picpars.com, Designer="Seyed Mohsen Ghasemain", E-mail=picpars@gmail.com
U: "Low-Side Gate Driver IC Inverting, Non-Inverting 8-PDIP", Package="DIP-8 Microchip", Digi-Key_Part_Number=TC4428CPA-ND, MF=Microchip, MP=TC4428CPA, SnapEDA_Link=https://www.snapeda.com/parts/TC4428CPA/Microchip/view-part/442163/?ref=snap
U1: "1 Circuit IC Switch 8:1 130Ohm 16-SOIC", Package="SOIC-16 Toshiba", Availability="In Stock", Check_prices=https://www.snapeda.com/parts/74HC4051D/Toshiba/view-part/?ref=eda, MF=Toshiba, MP=74HC4051D, Price=None, Purchase-URL=https://pricing.snapeda.com/search/part/74HC4051D/?ref=eda, SnapEDA_Link=https://www.snapeda.com/parts/74HC4051D/Toshiba/view-part/?ref=snap
U2: "Comparator General Purpose CMOS, DTL, ECL, MOS, Open-Collector, TTL 14-DIP", Package="PDIP-14 ON Semiconductor", Check_prices=https://www.snapeda.com/parts/LM339N/Onsemi/view-part/?ref=eda, MF="ON Semiconductor", MP=LM339N, SnapEDA_Link=https://www.snapeda.com/parts/LM339N/Onsemi/view-part/?ref=snap
U3 U4 U5 U6 U7 U8 U9 U10: "Low-Offset voltage (0.25mV) single operational amplifier 8-SOIC 0 to 70", Package="SOIC-8 Texas Instruments", Availability=Unavailable, MF="Texas Instruments", MP=OP07CD, Price=None, Purchase-URL=https://pricing.snapeda.com/search/part/OP07CD/?ref=eda, SnapEDA_Link=https://www.snapeda.com/parts/OP07CD/Texas%20Instruments/view-part/516771/?ref=snap
VR1 VR2: "1.5-A, 40-V, adjustable linear voltage regulator 3-TO-220", Package="TO-220-3 Texas Instruments", Check_prices=https://www.snapeda.com/parts/LM317T/Texas+Instruments/view-part/?ref=eda, MF="Texas Instruments", MP=LM317T, SnapEDA_Link=https://www.snapeda.com/parts/LM317T/Texas+Instruments/view-part/?ref=snap
Y1: library part ATS08A-E, "8MHz Â±30ppm Crystal 20pF 60 Ohms HC-49/US", Package="HC-49/US CTS-Frequency Controls", Availability=Good, Check_prices=https://www.snapeda.com/parts/ATS08A-E/CTS-Frequency%20Controls/view-part/2457201/?ref=eda, MF="CTS-Frequency Controls", MP=ATS08A-E, Price=None, Purchase-URL=https://pricing.snapeda.com/search/part/ATS08A-E/?ref=eda, SnapEDA_Link=https://www.snapeda.com/parts/ATS08A-E/CTS-Frequency%20Controls/view-part/2457201/?ref=snap

## Via types
v1: diameter 1, hole 0.5, Top Layer to Bottom Layer, tented both sides, 156 vias
v2: diameter 1.27, hole 0.5, Top Layer to Bottom Layer, tented both sides, 51 vias
v3: diameter 0.9, hole 0.5, Top Layer to Bottom Layer, tented both sides, 1 vias

## Nets (pads, with @x,y where several pads share a name; then routed paths per layer and width w, separated by ;. In a path a pad name is that pad's centre, name@x,y a point inside that pad or via, vN(x,y) a via of type N, cw(c..) or ccw(c..) an arc to the next point about the centre after c; other vN are vias at no path point)
+3.3: "USB to UART.1" B3.1 B3.13 B3.19 B3.32 B3.48 B3.64 C9.2 C13.2 C17.1 C18.1 C19.1 C20.1 C21.1 C22.1 J8.3 PROGRAMMER.1 R46.2 R59.2 VR2.2 | length 208.5
  Top Layer w0.3: v2@61.576,35.24 v2(61.656,35.24) ; R59.2@116.205,28.823 116.205,25.781 123.698,18.288
  Top Layer w0.8: R46.2@49.784,34.452 49.884,34.552 50.444,34.552 50.563,34.671 60.96,34.671 61.529,35.24 v2@61.576,35.24 ; v2(60.833,32.512) 60.96,32.512 61.195,32.747 61.299,32.747 61.826,33.274 61.826,34.944 61.656,35.113 v2(61.656,35.24)
  Top Layer w1: VR2.2@42.672,36.576 42.56,36.464 42.56,32.019 C13.2@42.545,32.004 C9.2@47.117,32.004 49.149,32.004 49.784,32.639 R46.2@49.784,34.452 ; v2(71.247,13.716) 74.676,13.716 87.174,26.214 87.174,27.865 88.519,29.21 ; v2(77.851,40.767) 80.137,40.767 88.519,32.385 88.519,29.21 ; PROGRAMMER.1@93.472,29.21 88.519,29.21
  Bottom Layer w0.3: 61.595,25.908 61.718,25.908 65.842,30.032 B3.1@66.652,30.032 ; C21.1@64.262,35.56 64.697,35.995 65.279,35.995 65.316,36.032 B3.13@66.652,36.032 68.544,36.032 69.64,37.128 B3.19@69.64,39.52 69.64,40.954 68.834,41.76 C19.1@68.834,41.91 ; C20.1@67.6,25.504 C20.1@67.6,25.654 67.6,25.804 68.64,26.844 B3.64@68.64,28.044 ; 74.295,18.161 74.422,18.288 ; C17.1@75.819,41.91 76.14,41.589 B3.32@76.14,39.52 ; B3.48@78.128,30.032 79.315,30.032 79.687,29.66 79.687,29.038 80.622,28.103 C18.1@80.772,28.103 C22.1@83.312,28.103 85.181,28.103 v2(87.122,26.162)
  Bottom Layer w0.8: v2(61.656,35.24) 61.784,35.24 62.103,35.56 C21.1@64.262,35.56
  Bottom Layer w1: v2@60.833,32.439 60.833,26.67 61.595,25.908 64.8,22.704 ; C20.1@67.6,25.504 65.879,23.783 ; v2(71.247,13.716) 64.643,20.32 64.643,22.547 65.879,23.783 ; C17.1@75.819,41.91 76.708,41.91 v2(77.851,40.767) ; J8.3@76.327,23.368 76.327,20.193 74.295,18.161 71.501,18.161 65.879,23.783 ; PROGRAMMER.1@93.472,29.21 112.776,29.21 123.698,18.288
+15: C1.2 C3.2 c10.1 C27.1 C28.1 C29.1 C30.1 C35.1 C36.1 C37.1 C38.1 IC.6 J5.C J6.C K1.1 K2.5 R18.2 R19.2 R21.2 R54.1 R55.1 R56.1 R57.2 T1.1 U2.3 U3.7 U4.7 U5.7 U6.7 U7.7 U8.7 U9.7 U10.7 U.6 VR1.3 VR2.3 | length 425.9
  Top Layer w0.5: v2(28.575,2.032) 28.575,8.001 v2(32.258,11.684)
  Top Layer w1: U3.7@3.118,13.208 4.318,13.208 5.316,12.21 C35.1@5.316,9.779 7.112,9.779 10.795,6.096 v2(15.24,6.096) ; T1.1@12.7,60.626 12.894,60.432 c10.1@20.32,60.432 ; c10.1@20.3,60.482 29.64,60.482 30.226,61.068 30.226,64.262 ; K2.5@28.448,71.12 28.448,68.199 29.258,67.389 29.258,66.733 29.571,66.421 J6.C@30.226,66.421 30.226,64.262 ; IC.6@42.545,48.26 40.894,48.26 39.878,49.276 R54.1@39.878,51.181 39.762,51.065 37.835,51.065 R56.1@37.719,50.948 37.719,62.738 36.195,64.262 30.226,64.262 ; v2(43.307,15.494) 43.323,15.51 43.323,18.932 v2(43.339,18.948) ; VR1.3@48.006,19.558 51.054,19.558 52.549,18.063 52.549,16.666 C1.2@52.578,16.637
  Bottom Layer w0.5: U5.7@30.029,12.7 30.714,12.7 31.583,11.831 32.111,11.831 v2(32.258,11.684)
  Bottom Layer w1: v2(15.24,6.096) 15.24,6.023 15.73,5.533 15.73,2.117 15.815,2.032 33.655,2.032 ; v2@15.274,6.057 15.279,6.057 15.572,6.35 U4.7@18.104,6.35 ; c10.1@20.32,60.432 20.27,60.382 19.996,60.382 18.669,59.055 18.669,44.958 20.524,43.103 20.683,43.103 20.987,42.799 K1.1@21.152,42.799 24.073,45.72 J5.C@26.162,45.72 26.162,41.402 35.306,32.258 ; K2.5@28.575,71.12 37.465,80.01 64.946,80.01 65.532,80.596 ; v2(32.258,11.684) C38.1@34.181,11.684 ; R18.2@33.528,3.683 33.514,3.669 33.514,2.173 33.655,2.032 ; R19.2@37.846,3.609 37.846,2.032 ; VR2.3@40.132,36.576 35.814,32.258 35.306,32.258 ; U6.7@41.713,15.621 41.788,15.546 43.255,15.546 v2(43.307,15.494) 43.359,15.442 43.359,15.147 44.427,14.079 C29.1@44.577,14.079 ; R21.2@41.91,3.535 41.91,2.032 ; IC.6@42.545,48.26 43.119,48.26 43.267,48.112 43.267,47.896 43.939,47.223 R55.1@45.72,47.223 45.845,47.223 47.932,45.136 48.199,45.136 R57.2@48.323,45.011 ; v2(43.339,18.948) 43.412,18.948 44.022,19.558 VR1.3@48.006,19.558 ; U7.7@61.906,92.075 63.929,92.075 63.982,92.022 64.061,92.022 65.501,90.582 65.501,89.291 65.472,89.262 C27.1@65.472,89.027 ; U2.3@63.754,52.644 65.532,54.422 65.532,64.643 ; C27.1@65.532,89.027 65.532,86.106 ; U.6@69.85,64.643 65.532,64.643 ; U8.7@76.511,93.472 79.043,93.472 79.629,92.886 79.629,86.106 ; 90.424,86.106 79.629,86.106 ; 90.524,86.106 108.331,86.106 109.601,87.376 109.601,94.537 109.015,95.123 U10.7@107.429,95.123 ; 90.932,86.565 90.932,94.537 91.518,95.123 U9.7@92.767,95.123 ; 33.655,2.032 37.846,2.032 ; 35.306,32.258 VR1.3@48.006,19.558 ; 37.846,2.032 41.91,2.032 ; 41.91,2.032 42.418,1.524 56.769,1.524 59.055,3.81 59.055,16.51 56.007,19.558 VR1.3@48.006,19.558 ; 65.532,64.643 65.532,80.596 ; 65.532,80.596 65.532,86.106 ; 65.532,86.106 79.629,86.106
+comparator: R32.1 R34.1 U2.5 U10.6 | length 95
  Bottom Layer w0.3: R34.1@107.008,88.138 R32.1@107.008,90.424 107.008,90.549 105.029,92.528 105.029,95.758 105.664,96.393 U10.6@107.429,96.393
  Bottom Layer w1: U2.5@68.834,52.644 78.293,62.103 96.012,62.103 117.729,83.82 117.729,94.996 116.332,96.393 U10.6@107.429,96.393